# Altium PCB FMU3_REV_G.PcbDoc (part 2 of 4)
Units mm, origin at the board's own origin, x right, y up, seen from the top; angles counter-clockwise.
Board outline 34.01 x 34.03 mm, 8 copper layers (Top, GND_top, HorizontalTop, Verticall_top, Horizontal_bot, VerticalBot, GND_BOT, Bottom), stack 1.63 mm thick; 169 components, 248 nets, 852 pads, 426 vias.
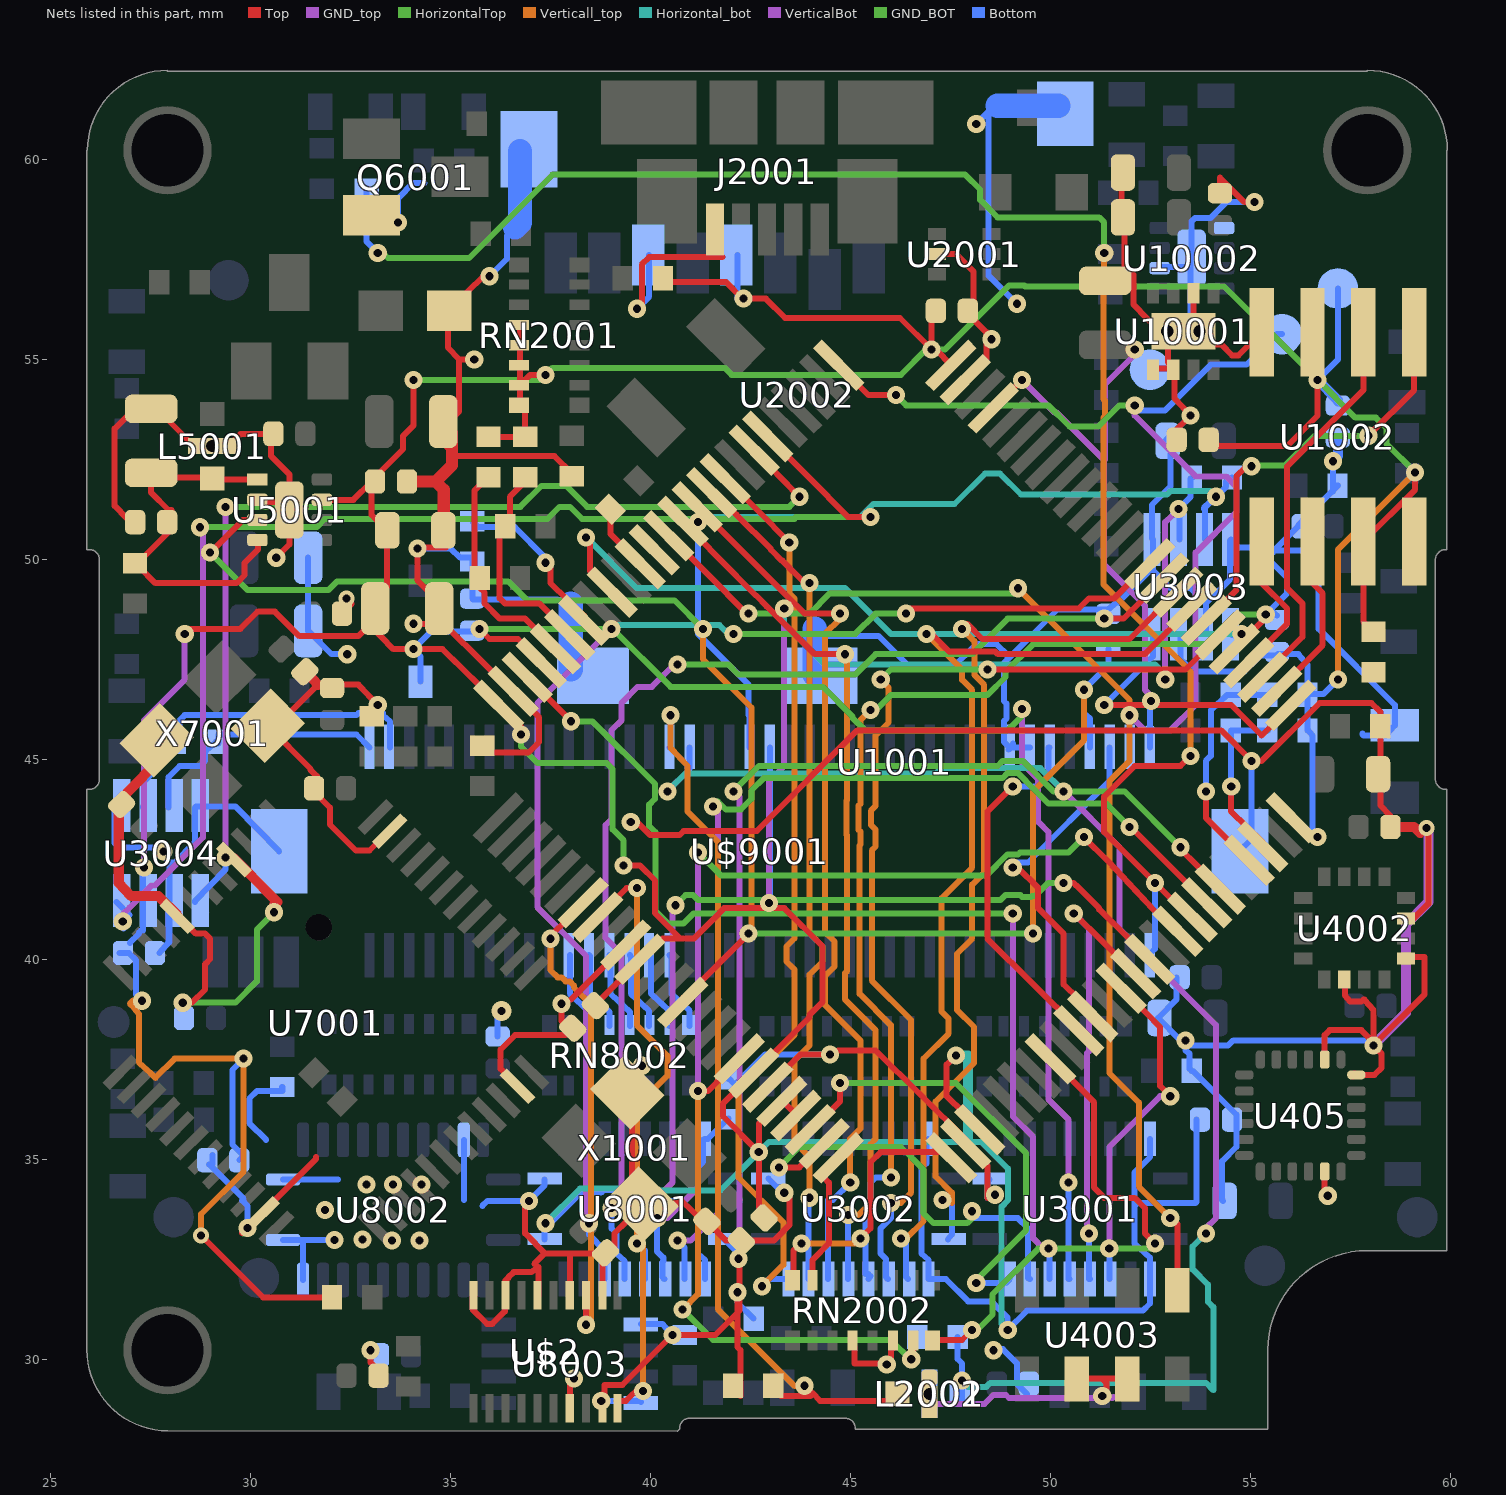
[diagram p8: the nets of this part, all layers, seen from the top]

## Via types
v1: diameter 0.453/0.453/0.453/0.453/0.453/0.453/0.453/0.453 (per signal layer), hole 0.203, Top to Bottom, tented both sides, 178 vias
v2: diameter 0.453/0.453/0.453/0.453 (per signal layer), hole 0.203, Top to Verticall_top, tented both sides, 116 vias
v3: diameter 0.453/0.453/0.453/0.453 (per signal layer), hole 0.203, Horizontal_bot to Bottom, tented both sides, 94 vias
v4: diameter 0.4, hole 0.2, Top to Verticall_top, tented both sides, 8 vias
v5: diameter 0.4, hole 0.2, Horizontal_bot to Bottom, tented both sides, 8 vias
v6: diameter 0.45, hole 0.2, Horizontal_bot to Bottom, tented bottom, 4 vias
v7: diameter 0.5, hole 0.2, Top to Verticall_top, tented both sides, 4 vias
v8: diameter 0.4, hole 0.2, Top to Bottom, tented bottom, 2 vias
v9: diameter 0.453/0.453/0.453/0.453/0.453/0.453/0.453/0.453 (per signal layer), hole 0.203, Top to Bottom, tented top, 2 vias
v10: diameter 0.5, hole 0.2, Horizontal_bot to Bottom, tented both sides, 2 vias
v11: diameter 0.453/0.453/0.453/0.453 (per signal layer), hole 0.203, Horizontal_bot to Bottom, tented bottom, 1 vias
v12: diameter 0.45, hole 0.2, Top to Verticall_top, tented top, 1 vias
v13: diameter 0/0/0/0/0/0 (per signal layer), hole 0.66, HorizontalTop to Bottom, tented bottom, 1 vias
v14: diameter 0.5, hole 0.2, Top to Bottom, tented both sides, 1 vias
v15: diameter 0.4, hole 0.2, Top to Bottom, tented both sides, 1 vias
v16: diameter 0.453/0.453/0.453/0.453/0.453/0.453/0.453/0.453 (per signal layer), hole 0.203, Top to Bottom, tented bottom, 1 vias
v17: diameter 0.453/0.453/0.453/0.453 (per signal layer), hole 0.203, Top to Verticall_top, tented top, 1 vias
v18: diameter 0.5, hole 0.2, HorizontalTop to Bottom, tented both sides, 1 vias

## Nets (pads, with @x,y where several pads share a name; then routed paths per layer and width w, separated by ;. In a path a pad name is that pad's centre, name@x,y a point inside that pad or via, vN(x,y) a via of type N, cw(c..) or ccw(c..) an arc to the next point about the centre after c; other vN are vias at no path point) (continued)
B\A\R\O\_\C\S\: U1001.88 U4003.5 | length 29.4
  Top w0.15: U1001.88@40.462,50.597 42.393,48.641 v2(42.443,48.641) ; v2(52.984,33.528) 53.162,33.376 U4003.5@53.162,31.725
  HorizontalTop w0.15: v2(42.443,48.641) 43.967,48.641 44.475,49.149 49.047,49.149 v2(49.174,49.276)
  Verticall_top w0.15: v2(49.174,49.276) 51.968,46.482 51.968,44.958 51.46,44.45 51.46,37.156 52.197,36.42 52.197,34.315 v2(52.984,33.528)
B\A\R\O\_\E\X\T\_\C\S\: U1001.8 U$2.1 | length 15.7
  Top w0.15: U1001.8@38.684,41.046 39.395,41.783 v2(39.649,41.783) ; U$2.1@39.141,28.956 39.375,28.956 39.776,29.357 39.802,29.332 v2(39.802,29.21) ; U$2.1@39.167,28.778 U$2.1@39.167,28.956
  Verticall_top w0.15: v2(39.649,41.783) 39.649,38.354 40.411,37.592 40.411,37.084 39.649,36.322 39.649,33.02 39.802,32.868 v2(39.802,29.21)
BATT_CURRENT_SENS: RN2002.16 U1001.26 | length 6.7
  Top w0.15: RN2002.16@43.561,31.979 43.561,32.715 43.739,32.893 v2(43.764,32.893) ; v2(45.237,33.02) 45.491,33.274 45.491,34.925 45.745,35.179 47.371,35.179 U1001.26@47.523,35.052
  Verticall_top w0.15: v2(43.764,32.893) 45.11,32.893 v2(45.237,33.02)
BATT_CURRENT_SENS_PROT: L2001.P$1 R2004.P$1 U$9001.49 | length 22.5
  Top w0.15: R2004.P$1@43.256,29.083 43.993,29.083 44.044,29.159 ; v2(43.84,29.337) 44.018,29.159 ; 43.942,29.083 44.018,29.159 ; L2001.P$1@46.025,28.88 45.999,28.88 45.999,28.956 44.231,28.956 44.044,29.159 ; 44.018,29.159 44.044,29.159
  Verticall_top w0.15: v1(40.488,46.101) 40.488,45.288 40.919,44.831 40.919,43.688 41.681,42.926 41.681,31.242 43.586,29.337 v2(43.84,29.337)
  Bottom w0.15: U$9001.49@40.462,45.288 40.488,45.314 v1(40.488,46.101)
BATT_VOLTAGE_SENS: RN2002.15 U1001.25 | length 3.4
  Top w0.15: RN2002.15@44.044,31.979 44.044,32.487 44.45,32.893 44.45,34.417 44.348,34.519 44.348,34.671 44.704,35.027 U1001.25@44.704,35.052
BATT_VOLTAGE_SENS_PROT: L2002.P$1 R2003.P$1 U$9001.47 | length 37.4
  Horizontal_bot w0.15: v3(40.411,44.196) 40.864,44.649 47.134,44.649 47.261,44.776 49.738,44.776 v3(50.317,44.196) ; v3(47.777,29.464) 47.93,29.312 48.385,29.312 48.482,29.408 53.878,29.408 54.061,29.226 54.061,31.303 53.929,31.435 53.929,31.866 53.546,32.249 53.546,32.819 v3(53.873,33.147) 53.752,33.147 v3@53.813,33.086
  VerticalBot w0.15: v3(50.317,44.196) 51.714,42.799 51.714,40.767 54.127,38.354 54.127,33.528 53.873,33.274 v3(53.873,33.147)
  Bottom w0.15: v3(40.411,44.196) 40.97,44.755 U$9001.47@40.97,45.288 ; L2002.P$1@47.625,28.88 47.701,28.956 47.777,28.956 v3(47.777,29.464) ; R2003.P$1@47.668,30.556 47.668,30.005 47.777,29.896 v3(47.777,29.464) ; v3@47.854,29.464 47.854,29.54 v3(47.777,29.464)
CAN1_RX: U1001.81 U3004.4 | length 32.3
  Top w0.15: U1001.81@42.926,53.086 44.933,51.054 v2(45.491,51.054)
  HorizontalTop w0.15: v1(28.727,50.8) 31.648,50.8 31.854,51.006 37.41,51.006 37.71,51.306 37.982,51.306 38.282,51.006 43.585,51.006 43.633,51.054 v2(45.491,51.054)
  VerticalBot w0.15: v3(26.797,40.945) 26.797,41.123 26.966,41.292 27.513,41.838 27.594,41.838 28.799,43.043 28.799,50.728 v1(28.727,50.8)
  Bottom w0.15: U3004.4@26.645,41.427 26.966,41.106 26.805,40.945 v3(26.797,40.945) 26.797,40.792 26.816,40.774 U3004.4@26.695,40.894
CAN1_TX: U1001.82 U3004.1 | length 26.7
  Top w0.15: U1001.82@42.57,52.73 v2(43.713,51.562)
  HorizontalTop w0.15: v1(29.362,51.308) 36.739,51.308 37.265,51.835 37.88,51.835 38.407,51.308 43.459,51.308 v2(43.713,51.562)
  VerticalBot w0.15: v3(29.362,42.545) v1(29.362,51.308)
  Bottom w0.15: U3004.1@28.6,41.427 28.6,41.453 29.362,42.24 v3(29.362,42.545)
CAN2_RX: U1001.51 U3003.4 | length 7.7
  Top w0.15: v1(51.333,46.355) 54.508,46.355 55.27,45.593 56.007,46.33 U1001.51@56.007,46.355
  Bottom w0.15: v1@51.333,46.482 v1(51.333,46.355) 52.553,47.574 U3003.4@52.553,48.133
CAN2_TX: U1001.92 U3003.1 | length 19.3
  Top w0.15: v1(38.379,50.546) 38.481,50.444 38.481,49.708 39.014,49.2 U1001.92@39.04,49.2
  Horizontal_bot w0.15: v1(38.379,50.546) 39.649,49.276 44.856,49.276 45.999,48.133 v3(54.762,48.133)
  Bottom w0.15: U3003.1@54.508,48.133 54.534,48.108 54.737,48.108 v3(54.762,48.133)
CAN_H_1: R3010.P$1 U3004.7 U$9001.79 | length 6.7
  Bottom w0.15: U3004.7@27.94,43.79 27.94,44.552 28.219,44.831 28.727,44.831 28.854,44.958 28.854,45.212 28.88,45.212 29.134,45.441 29.185,45.39 29.185,45.618 32.639,45.618 U$9001.79@32.969,45.288
CAN_H_2: R3009.P$1 U3003.7 U$9001.41 | length 22.3
  Horizontal_bot w0.15: v3(41.173,50.927) 41.3,51.054 45.237,51.054 45.563,51.38 47.59,51.38 48.352,52.142 48.727,52.142 49.252,51.617 52.907,51.617 53,51.71 53.979,51.71 v3(54.127,51.562)
  Bottom w0.15: v3(41.173,50.927) 41.173,48.133 42.443,46.863 42.443,46.101 42.469,46.101 U$9001.41@42.469,45.288 ; U3003.7@53.848,50.495 53.848,51.283 ; v3(54.127,51.562) 53.848,51.283 ; R3009.P$1@54.534,52.045 54.432,51.943 54.381,51.943 54.381,51.816 54.122,51.568 53.823,51.283 53.823,51.257 53.848,51.283
CAN_L_1: R3010.P$2 U3004.6 U$9001.77 | length 8.7
  Bottom w0.15: U3004.6@27.305,43.79 27.305,43.815 27.33,43.866 27.33,44.45 28.143,45.263 28.143,45.466 28.219,45.568 28.219,45.974 28.346,46.101 32.639,46.101 32.69,46.152 33.299,46.152 33.299,46.101 33.477,45.949 U$9001.77@33.477,45.288
CAN_L_2: R3009.P$2 U3003.6 U$9001.39 | length 28.2
  Horizontal_bot w0.15: v3(43.332,48.768) 43.332,48.387 44.348,47.371 52.603,47.371 52.857,47.117 v3(52.857,46.99) v3@52.857,46.863
  VerticalBot w0.15: v3(42.951,41.402) 42.951,44.45 43.332,44.831 v3(43.332,48.768) ; v3(52.857,46.99) 52.857,50.927 53.188,51.232 v3(53.188,51.257)
  Bottom w0.15: v3(42.951,41.402) 42.977,41.427 U$9001.39@42.977,45.288 ; U3003.6@53.213,50.495 53.213,51.232 v3(53.188,51.257) 53.492,51.562 53.492,52.019 R3009.P$2@53.543,52.045
E\X\T\E\R\N\_\C\S\: U1001.36 U$9001.5 | length 8.8
  Top w0.15: v1(49.047,42.291) 49.174,42.291 49.682,41.783 49.682,41.275 50.317,40.64 50.317,39.37 51.054,38.659 U1001.36@51.054,38.583
  Bottom w0.15: v1(49.047,42.291) 49.174,42.418 49.428,42.418 51.46,44.45 U$9001.5@51.46,45.288
EXTERN_DRDY: U1001.35 U$9001.11 | length 9
  Top w0.15: v1(49.047,44.323) 48.412,43.688 48.412,40.513 50.698,38.252 U1001.35@50.698,38.227
  Bottom w0.15: v1(49.047,44.323) 49.682,44.323 49.936,44.577 49.936,45.288 U$9001.11@49.962,45.288
F\M\U\-\L\E\D\_\A\M\B\E\R\: R6013.P$1 U1001.43 U$9001.2 | length 43.9
  Top w0.15: U1001.43@53.302,41.212 v1(52.603,41.91) 51.333,43.18 51.333,44.069 52.095,44.831 53.238,44.831 v2(53.492,45.085)
  HorizontalTop w0.15: v1(33.172,57.658) 33.299,57.658 33.426,57.531 35.458,57.531 37.541,59.614 47.859,59.614 48.23,59.243 48.23,58.983 48.666,58.547 51.206,58.547 51.333,58.42 v2(51.333,57.658)
  Verticall_top w0.15: v2(51.333,57.658) 51.333,57.302 51.312,57.281 51.312,54.001 51.354,53.959 51.354,53.584 51.312,53.542 51.312,49.373 53.492,47.193 v2(53.492,45.085)
  Bottom w0.15: R6013.P$1@32.893,59.284 32.893,57.937 v1(33.172,57.658) ; U$9001.2@52.476,40.107 52.476,40.132 52.603,40.259 v1(52.603,41.91)
F\R\A\M\_\C\S\: U1001.57 U1002.1 | length 10.7
  Top w0.15: U1001.57@53.899,48.489 54.635,49.225 54.635,52.07 54.889,52.324 v2(55.016,52.324) ; v2(57.937,53.086) 59.08,54.229 U1002.1@59.08,55.677
  HorizontalTop w0.15: v2(55.016,52.324) 55.042,52.349 55.855,52.349 56.591,53.086 v2(57.937,53.086)
FMU-!RESET: C5015.P$2 U1001.14 U5001.3 U$9001.7 | length 42
  Top w0.15: v2(28.981,50.165) 29.794,50.978 30.15,50.978 U5001.3@30.175,51.003 ; U1001.14@40.869,38.938 40.818,38.938 U1001.14@40.818,39.014 ; v2(42.443,40.64) U1001.14@40.843,39.04 ; U1001.14@40.818,39.014 U1001.14@40.843,39.04 ; U1001.14@40.818,39.014 40.818,39.04 U1001.14@40.843,39.04
  HorizontalTop w0.15: v2(28.981,50.165) 29.917,49.23 31.938,49.23 32.156,49.448 36.429,49.448 36.906,48.971 40.589,48.971 v2(41.3,48.26) ; v2(42.443,40.64) v2(49.555,40.64)
  Verticall_top w0.15: v2(41.3,48.26) 41.3,47.503 42.515,46.289 42.515,40.712 v2(42.443,40.64) ; v2(49.555,40.64) 49.555,44.196 50.825,45.466 v1(50.825,46.736)
  Bottom w0.15: U$9001.7@50.978,45.288 50.978,46.025 50.825,46.152 v1(50.825,46.736) 51.435,47.346 C5015.P$2@51.435,47.752
FMU-BOOT0: R5006.P$2 U1001.94 | length 4.2
  Top w0.15: v1(37.363,49.911) 37.49,49.784 37.49,49.403 38.329,48.59 U1001.94@38.329,48.489
  Bottom w0.15: R5006.P$2@35.535,50.952 35.687,50.8 36.601,50.8 37.363,50.038 v1(37.363,49.911)
FMU-CH1: U1001.45 U8001.1 | length 26.6
  Top w0.15: v2(53.238,42.799) 53.188,42.799 U1001.45@54.254,41.758
  HorizontalTop w0.15: v1(42.062,44.196) 42.697,44.831 48.664,44.831 48.786,44.953 49.308,44.953 49.678,44.584 49.678,44.582 50.063,44.196 51.841,44.196 v2(53.238,42.799)
  VerticalBot w0.15: v1(42.062,44.196) 42.215,44.069 42.215,32.41 42.189,32.385 v3(42.189,32.512)
  Bottom w0.15: U8001.1@41.834,32.995 42.189,32.639 v3(42.189,32.512)
FMU-CH1-PROT: RN8002.16 U$9001.50 | length 2
  Bottom w0.15: U$9001.50@40.462,40.107 40.513,40.03 40.513,39.141 40.97,38.71 RN8002.16@40.97,38.329
FMU-CH2: U1001.44 U8001.3 | length 26.2
  Top w0.15: v2(51.968,43.307) 51.994,43.307 U1001.44@53.429,41.872
  HorizontalTop w0.15: v1(41.554,43.815) 41.679,43.939 41.875,43.743 42.25,43.743 42.515,44.008 42.515,44.221 42.823,44.529 48.789,44.529 48.912,44.651 49.183,44.651 49.375,44.459 49.375,44.457 49.938,43.894 51.382,43.894 v2(51.968,43.307)
  VerticalBot w0.15: v3(40.665,32.969) 40.996,32.969 41.681,33.655 41.681,43.688 v1(41.554,43.815)
  Bottom w0.15: v3(40.665,32.969) 40.843,32.791 U8001.3@40.843,32.004
FMU-CH2-PROT: RN8002.15 U$9001.52 | length 2
  Bottom w0.15: U$9001.52@39.98,40.107 40.005,40.056 40.005,39.141 40.462,38.71 RN8002.15@40.462,38.329
FMU-CH3: U1001.42 U8001.4 | length 24.8
  Top w0.15: v2(50.825,43.053) 51.416,42.462 52.935,40.846 U1001.42@53.01,40.843
  HorizontalTop w0.15: v1(41.173,42.672) 41.758,42.088 48.381,42.088 48.912,42.619 49.183,42.619 49.23,42.665 50.438,42.665 v2(50.825,43.053)
  VerticalBot w0.15: v3(40.157,33.528) 40.411,33.528 41.173,34.29 v1(41.173,42.672)
  Bottom w0.15: v3(40.157,33.528) 40.157,32.69 40.31,32.537 40.31,32.461 40.284,32.436 40.284,32.055 U8001.4@40.335,32.004
FMU-CH3-PROT: RN8002.14 U$9001.54 | length 2
  Bottom w0.15: U$9001.54@39.472,40.107 39.497,40.056 39.497,39.141 39.954,38.71 RN8002.14@39.954,38.329
FMU-CH4: U1001.40 U8001.5 | length 22.9
  Top w0.15: v2(50.317,41.91) 50.566,41.91 50.638,41.838 50.643,41.838 51.206,41.275 51.206,41.25 U1001.40@52.476,40.005
  HorizontalTop w0.15: v1(40.615,41.351) 40.864,41.601 41.055,41.601 41.173,41.483 48.742,41.483 48.86,41.601 49.235,41.601 49.279,41.557 49.503,41.557 49.526,41.58 49.606,41.58 49.936,41.91 v2(50.317,41.91)
  VerticalBot w0.15: v3(39.649,32.893) 39.649,33.528 39.705,33.583 39.705,33.716 39.97,33.981 40.102,33.981 40.538,34.417 40.538,41.275 v1(40.615,41.351)
  Bottom w0.15: v3(39.649,32.893) 39.853,32.715 U8001.5@39.853,32.004
FMU-CH4-PROT: RN8002.13 U$9001.56 | length 2
  Bottom w0.15: U$9001.56@38.964,40.107 38.989,40.056 38.989,39.141 39.472,38.684 RN8002.13@39.472,38.329
FMU-CH5: U1001.60 U8001.6 | length 30.2
  Top w0.15: v2(51.333,48.514) 51.816,48.514 U1001.60@52.832,49.53
  HorizontalTop w0.15: v1(40.665,47.371) 41.935,47.371 42.189,47.117 45.11,47.117 45.618,47.625 48.031,47.625 48.92,48.514 v2(51.333,48.514)
  VerticalBot w0.15: v3(39.014,33.782) 39.268,34.036 39.268,40.132 38.866,40.534 38.866,43.35 39.014,43.498 39.014,45.72 39.268,45.974 39.268,46.411 39.665,46.808 40.026,46.808 40.665,47.447 v1(40.665,47.371)
  Bottom w0.15: v3(39.014,33.782) 39.014,33.274 39.141,33.147 39.141,32.639 39.345,32.461 U8001.6@39.345,32.004
FMU-CH5-PROT: RN8002.12 U$9001.58 | length 2
  Bottom w0.15: U$9001.58@38.456,40.107 38.481,40.081 38.481,39.141 38.964,38.684 RN8002.12@38.964,38.329
FMU-CH6: U1001.61 U8001.7 | length 32
  Top w0.15: v2(46.38,48.641) 46.507,48.768 50.698,48.768 50.952,49.022 51.587,49.022 52.451,49.886 U1001.61@52.476,49.886
  HorizontalTop w0.15: v1(42.062,48.133) 45.11,48.133 45.618,48.641 v2(46.38,48.641)
  Horizontal_bot w0.15: v3(39.014,48.26) 39.112,48.357 41.711,48.357 41.935,48.133 v1(42.062,48.133)
  VerticalBot w0.15: v3(38.456,33.401) 38.456,33.604 38.379,33.678 38.379,40.081 37.16,41.3 37.16,46.406 v3(39.014,48.26)
  Bottom w0.15: v3(38.456,33.401) 38.456,33.122 38.837,32.715 U8001.7@38.837,32.004
FMU-CH6-PROT: RN8002.11 U$9001.60 | length 2
  Bottom w0.15: U$9001.60@37.973,40.107 37.973,40.081 37.973,39.141 38.456,38.684 RN8002.11@38.456,38.329
FMU-I2C1_SCL: R3002.P$1 R3007.P$1 U1001.95 | length 5.5
  Top w0.15: R3002.P$1@36.855,52.07 36.855,51.943 36.474,51.562 36.474,50.927 36.398,50.825 36.271,50.825 36.22,50.8 36.22,49.022 36.347,48.895 37.211,48.895 U1001.95@37.973,48.133
FMU-I2C1_SDA: R3004.P$1 R3008.P$1 U1001.96 | length 5.8
  Top w0.15: R3008.P$1@35.738,49.403 35.585,49.53 35.585,51.714 R3004.P$1@35.941,52.07 ; R3008.P$1@35.738,49.53 35.738,49.276 35.839,49.174 35.839,48.895 36.22,48.514 36.855,48.514 U1001.96@37.617,47.777
FMU-I2C2_SCL: R3001.P$1 R3005.P$1 U1001.47 | length 5.9
  Top w0.15: v1(53.873,44.196) 53.873,43.536 54.94,42.469 U1001.47@54.94,42.52
  Bottom w0.15: v1(53.873,44.196) 53.873,44.958 54,45.085 54,46.228 54.407,46.609 54.508,46.609 R3001.P$1@55.423,46.609
FMU-I2C2_SDA: R3003.P$1 R3006.P$1 U1001.48 | length 4.1
  Top w0.15: v1(54.508,44.323) 54.508,43.688 55.296,42.926 U1001.48@55.296,42.824
  Bottom w0.15: v1(54.508,44.323) 54.508,45.593 54.508,45.72 R3003.P$1@55.423,45.72
FMU-SWCLK: FMU-SWCLK.P$1 U1001.76 U$9001.3 | length 25.1
  Top w0.15: U1001.76@44.704,54.839 45.441,54.102 v2(46.126,54.102)
  HorizontalTop w0.15: v2(46.126,54.102) 46.38,53.848 49.936,53.848 50.465,53.319 51.185,53.319 51.714,53.848 v1(52.095,53.848)
  VerticalBot w0.15: v3(51.968,46.101) 52.349,45.72 52.984,45.72 53.619,46.355 53.619,50.165 54.635,51.181 54.635,51.816 54.381,52.07 53.619,52.07 52.095,53.594 v1(52.095,53.848)
  Bottom w0.15: U$9001.3@51.968,45.288 v3(51.968,46.101) ; v1(52.095,53.848) 52.222,53.721 52.857,53.721 54,54.864 54.889,54.864 55.651,55.626 FMU-SWCLK.P$1@55.778,55.626
FMU-SWDIO: FMU-SWDIO.P$1 U1001.72 U$9001.1 | length 14.8
  Top w0.15: U1001.72@48.59,53.772 v1(49.276,54.483)
  VerticalBot w0.15: v1(49.276,54.483) 50.086,53.673 50.137,53.673 51.333,52.476 ; v3(52.095,55.245) 52.095,55.118 51.333,54.356 51.354,54.335 51.354,52.497 51.333,52.476 ; v3(52.502,46.457) 52.578,46.457 52.603,46.482 52.349,46.736 52.349,48.844 51.333,49.86 51.333,52.476
  Bottom w0.15: U$9001.1@52.476,45.288 52.476,46.431 v3(52.502,46.457)
FMU-SWO: U1001.89
FMU-UART4_RX: U1001.24 U3001.8 | length 10.8
  Top w0.15: v2(43.205,34.798) 43.713,34.798 44.348,35.433 U1001.24@44.348,35.408
  HorizontalTop w0.15: v2(43.205,34.798) 43.713,35.306 46.253,35.306 46.812,34.747 46.812,33.655 47.066,33.401 47.904,33.401 v1@48.031,33.528
  Bottom w0.15: v1@48.031,33.528 49.174,33.528 49.428,33.274 49.428,32.029 U3001.8@49.479,32.004
  other v1: 48.031,33.7
FMU-UART4_TX: U1001.23 U3001.9 | length 11.5
  Top w0.15: U1001.23@43.993,35.763 44.044,35.763 44.729,36.449 v2(44.729,36.906)
  HorizontalTop w0.15: v2(44.729,36.906) 47.625,36.906 49.38,35.152 49.38,33.225 48.133,31.979 v1(48.133,31.902)
  Bottom w0.15: v1(48.133,31.902) 48.87,31.902 U3001.9@48.971,32.004
FMU-UART7_RX: U1001.38 U3001.4 | length 8.6
  Top w0.15: U1001.38@51.689,39.294 51.765,39.294 52.73,38.303 52.73,36.83 v1(52.984,36.576)
  VerticalBot w0.15: v3(51.46,32.766) 51.46,35.306 52.73,36.576 v1(52.984,36.576)
  Bottom w0.15: U3001.4@51.46,32.004 v3(51.46,32.766)
FMU-UART7_TX: U1001.39 U3001.5 | length 11.5
  Top w0.15: v1(50.571,41.148) 52.095,39.649 U1001.39@52.121,39.649
  VerticalBot w0.15: v1(50.571,41.148) 50.952,40.767 50.952,37.697 50.908,37.652 50.908,33.192 v3(50.952,33.147)
  Bottom w0.15: v3(50.952,33.147) 50.952,32.004 U3001.5@50.978,32.004
FMU-UART8_RX: U1001.97 U3001.6 | length 31.6
  Top w0.15: v2(35.712,48.26) 35.966,48.006 36.678,48.006 U1001.97@37.287,47.422
  HorizontalTop w0.15: v2(35.712,48.26) 39.04,48.26 40.492,46.808 44.302,46.808 45.039,46.071 45.039,46.04 45.359,45.72 48.92,45.72 49.276,46.076 v1(49.276,46.253)
  VerticalBot w0.15: v1(49.276,46.253) 49.276,44.907 49.682,44.501 49.682,43.434 49.936,43.18 49.936,36.5 50.444,35.992 v3(50.444,34.417)
  Bottom w0.15: v3(50.444,34.417) 50.444,32.004 U3001.6@50.47,32.004
FMU-UART8_TX: U1001.98 U3001.7 | length 26.4
  Top w0.15: U1001.98@36.908,47.055 37.998,45.964 v2(37.998,45.949)
  HorizontalTop w0.15: v2(37.998,45.949) 38.537,45.949 40.102,44.384 40.102,44.008 39.959,43.865 39.959,43.332 40.109,43.182 40.109,41.216 40.427,40.898 40.818,40.898 41.067,41.148 v1(49.047,41.148)
  VerticalBot w0.15: v1(49.047,41.148) 49.047,36.068 49.555,35.56 49.555,33.02 49.809,32.766 v3(49.936,32.766)
  Bottom w0.15: v3(49.936,32.766) 49.962,32.766 U3001.7@49.962,32.004
FMU-USART2_CTS: U1001.84 U3002.9 | length 23.1
  Top w0.15: U1001.84@41.859,52.019 41.885,52.019 v2(43.459,50.419)
  Verticall_top w0.15: v1(42.774,31.826) 43.309,32.362 43.309,33.424 42.189,34.544 42.189,36.703 43.586,38.1 43.586,39.746 43.388,39.944 43.388,40.32 43.586,40.518 43.586,49.022 43.459,49.149 v2(43.459,50.419)
  Bottom w0.15: v1(42.774,31.826) 42.954,32.007 U3002.9@43.437,32.007
FMU-USART2_RTS: U1001.85 U3002.8 | length 21.4
  Top w0.15: U1001.85@41.529,51.664 41.605,51.664 42.139,51.116 43.007,50.248 43.007,50.231 43.272,49.966 43.289,49.966 43.852,49.403 v2(43.967,49.403)
  Verticall_top w0.15: v1(43.967,34.036) 43.967,35.052 43.586,35.433 43.586,37.465 43.967,37.846 43.967,39.619 44.293,39.944 44.293,40.32 43.967,40.645 v2(43.967,49.403)
  Bottom w0.15: U3002.8@43.942,32.004 43.942,34.011 v1(43.967,34.036)
FMU-USART2_RX: U1001.87 U3002.6 | length 21.9
  Top w0.15: U1001.87@40.818,50.952 40.818,50.927 41.681,50.038 42.626,49.094 42.631,49.094 42.896,48.829 42.896,48.823 44.094,47.625 v2(44.856,47.625)
  Verticall_top w0.15: v2(44.856,47.625) 44.898,47.583 44.898,43.968 44.892,43.963 44.892,43.109 44.898,43.103 44.898,39.694 44.856,39.652 44.856,38.989 45.618,38.227 45.618,35.509 45.491,35.382 45.491,33.909 45.187,33.604 v1(44.933,33.604)
  Bottom w0.15: U3002.6@44.933,32.004 v1(44.933,33.604)
FMU-USART2_TX: U1001.86 U3002.7 | length 22.4
  Top w0.15: U1001.86@41.173,51.308 41.199,51.308 41.764,50.724 43.846,48.641 v2(44.729,48.641)
  Verticall_top w0.15: v2(44.729,48.641) 44.729,48.514 44.348,48.133 44.348,40.692 44.596,40.445 44.596,39.819 44.348,39.572 44.348,38.862 45.237,37.973 45.237,35.763 44.983,35.509 v1(44.983,34.417)
  Bottom w0.15: U3002.7@44.425,32.004 44.425,33.985 44.552,33.985 v1(44.983,34.417)
FMU-USART3_CTS: U1001.58 U3002.3 | length 25
  Top w0.15: v2(46.888,48.133) 47.015,48.133 47.457,47.691 48.219,47.691 48.225,47.697 48.6,47.697 48.672,47.625 52.349,47.625 53.543,48.819 U1001.58@53.543,48.844
  Verticall_top w0.15: v1(46.253,33.02) 46.38,33.02 46.815,33.454 46.815,37.513 47.443,38.141 47.443,38.516 47.269,38.69 47.269,41.529 48.031,42.291 48.031,46.734 47.782,46.983 47.782,47.239 v2(46.888,48.133)
  Bottom w0.15: v1(46.253,33.02) 46.38,32.893 46.38,32.055 U3002.3@46.431,32.004
FMU-USART3_RTS: U1001.59 U3002.1 | length 22.7
  Top w0.15: v2(47.777,48.26) 47.904,48.387 48.285,48.006 51.968,48.006 53.162,49.2 U1001.59@53.188,49.2
  Verticall_top w0.15: 47.523,33.909 47.523,34.163 47.117,34.569 47.117,36.444 48.078,37.404 48.078,38.309 47.65,38.736 47.65,40.132 48.031,40.513 48.031,41.863 48.334,42.166 48.334,46.859 48.085,47.108 48.085,47.953 v2(47.777,48.26)
  Bottom w0.15: U3002.1@47.422,32.995 47.523,33.122 47.523,33.909
  other v1: 47.295,33.985
FMU-USART3_RX: U1001.56 U3002.4 | length 25.3
  Top w0.15: v2(48.412,47.244) 53.365,47.244 U1001.56@54.254,48.133
  HorizontalTop w0.15: v2(45.745,46.99) 45.999,47.244 v2(48.412,47.244)
  Verticall_top w0.15: v2(45.745,46.99) 45.944,46.791 45.944,45.919 45.618,45.593 45.618,43.834 45.497,43.712 45.497,43.359 45.618,43.238 45.618,42.818 45.522,42.722 45.522,39.466 46.507,38.481 46.507,34.163 46.253,33.909 v1(45.999,33.909)
  Bottom w0.15: U3002.4@45.923,32.004 45.872,32.055 45.872,32.512 45.745,32.639 45.745,33.274 45.999,33.528 v1(45.999,33.909)
FMU-USART3_TX: U1001.55 U3002.5 | length 27.4
  Top w0.15: U1001.55@54.61,47.777 55.372,48.539 v2(55.372,48.616)
  HorizontalTop w0.15: v2(45.491,46.228) 45.624,46.228 46.005,46.609 48.418,46.609 48.865,47.056 48.865,47.189 49.555,47.879 53.873,47.879 54.61,48.616 v2(55.372,48.616)
  Verticall_top w0.15: v2(45.491,46.228) 45.237,45.974 45.237,43.88 45.195,43.837 45.195,43.234 45.237,43.191 45.237,42.864 45.22,42.847 45.22,39.133 45.999,38.354 v1(45.999,34.544)
  Bottom w0.15: U3002.5@45.441,32.004 45.491,32.08 45.441,32.131 45.364,32.131 45.364,33.401 45.491,33.528 45.491,34.417 45.618,34.544 v1(45.999,34.544)
FMU-VDD_3V3: C1001.P$1 C3001.P$1 C3002.P$1 C3003.P$1 C3004.P$1 C5004.P$1 C5005.P$1 C5006.P$1 C5009.P$1 C5010.P$1 C5011.P$1 C5012.P$1 C5014.P$1 C8002.P$1 D5001.A FMU-VDD_3V3.P$1 R1022.P$1 R3001.P$2 R3002.P$2 R3003.P$2 R3004.P$2 R4002.P$2 R7012.P$2 RN2001.12 RN2001.13 RN2001.14 RN2001.15 RN2001.16 U1001.21 U1001.22 U1001.VDD U1002.3 U1002.7 U1002.8 U2002.4 U3001.2 U3001.19 U3002.2 U3002.19 U3003.3 U3004.3 U5001.7 U8001.2 U8001.10 U8001.19 | length 192.3
  Top w0.15: v1(28.346,48.133) 28.473,48.26 29.738,48.26 30.165,48.687 30.6,48.687 31.21,48.078 32.685,48.078 32.969,48.362 33.563,47.752 v1(34.061,47.752) 34.788,47.752 36.22,46.355 36.754,45.822 v2(36.754,45.618) ; U5001.7@31.775,51.486 32.563,51.486 C5005.P$1@33.02,51.943 ; C5006.P$1@33.109,48.768 32.969,48.628 32.969,48.768 32.995,48.819 32.995,48.895 33.401,49.301 33.401,50.698 33.376,50.724 33.02,51.105 C5005.P$1@33.02,51.943 ; v2(34.061,54.483) 34.061,53.34 33.807,53.086 33.807,52.756 33.02,51.968 C5005.P$1@33.02,51.943 ; R3004.P$2@35.941,53.061 R3002.P$2@36.855,53.061 ; RN2001.12@36.728,55.855 RN2001.15@36.728,54.356 ; R3002.P$2@36.855,53.111 R3002.P$2@36.855,53.061 ; v2(37.363,54.61) 36.982,54.61 RN2001.15@36.728,54.356 ; C5012.P$1@38.684,38.913 38.684,38.938 U1001.VDD@39.751,40.005 ; v1(39.319,42.342) 39.731,42.342 40.102,41.971 40.102,41.152 40.742,40.513 ; U1001.VDD@39.751,40.107 U1001.VDD@39.751,40.005 ; R1022.P$1@40.4,56.925 41.881,56.925 42.291,56.515 42.875,56.515 43.358,56.032 46.228,56.032 v1(47.015,55.245) ; C5014.P$1@42.901,33.604 42.697,33.807 v1(42.697,35.179) ; U1001.22@43.637,36.119 43.282,36.449 42.697,35.89 v1(42.697,35.179) ; C5009.P$1@47.041,56.21 47.015,56.21 47.015,55.296 47.066,55.296 v1(47.015,55.245) ; U1001.VDD@47.523,54.839 47.117,55.245 v1(47.015,55.245) ; v1@47.727,37.694 47.396,37.363 47.396,36.576 U1001.VDD@48.235,35.763 ; C5010.P$1@54.051,52.984 54.204,52.832 55.905,52.832 56.667,53.594 v1(56.667,54.483) ; R4002.P$2@58.064,48.184 57.81,48.438 U1002.7@57.81,50.444 59.106,51.74 v2(59.106,52.172) ; RN2001.15@36.728,54.356 36.728,53.873 36.855,53.721 R3002.P$2@36.855,53.061 ; U1001.VDD@39.751,40.005 40.284,40.513 40.742,40.513 ; 40.742,40.513 41.072,40.513 41.834,41.275 43.338,41.275 44.293,40.32 44.293,38.934 43.967,38.608 43.967,38.557 41.808,36.398 41.808,36.068 v1(42.697,35.179)
  Top w0.152: v4(28.753,33.096) 30.302,31.547 R7012.P$2@32.029,31.547
  HorizontalTop w0.15: v2(34.061,54.483) v2@37.236,54.483 ; v2(36.754,45.618) 36.754,45.314 37.165,44.903 38.892,44.903 39.044,44.75 39.044,43.246 39.319,42.971 v1(39.319,42.342) ; v2(37.363,54.61) 37.539,54.785 41.843,54.785 42.018,54.61 46.253,54.61 46.888,55.245 v1(47.015,55.245) 47.354,55.245 48.95,56.841 49.337,56.841 49.358,56.82 54.331,56.82 v1(56.667,54.483) 57.612,53.539 58.125,53.539 58.39,53.274 58.39,52.887 v2(59.106,52.172)
  Verticall_top w0.15: v1(27.28,38.964) 27.051,38.964 26.975,38.887 27.076,38.786 27.203,38.633 27.203,37.414 27.508,37.135 27.61,37.033 28.092,37.516 v1(29.82,37.516) ; v1(57.175,46.99) 57.175,50.241 v2(59.106,52.172)
  Verticall_top w0.152: v4(28.753,33.096) 28.753,33.625 29.82,34.692 v1(29.82,37.516)
  Horizontal_bot w0.15: v3(37.363,33.401) 38.227,34.265 39.798,34.265 39.843,34.219 41.738,34.219 v1(42.697,35.179) 42.951,35.433 47.904,35.433 48.26,35.433 48.929,34.764 48.929,33.976 48.768,33.816 48.768,30.886 v3(48.92,30.734)
  Horizontal_bot w0.254: v1@47.828,37.592 47.93,37.592 47.93,35.433 47.904,35.433
  VerticalBot w0.15: v3(27.33,42.291) 27.33,45.974 28.346,46.99 v1(28.346,48.133)
  Bottom w0.15: C3004.P$1@26.721,40.157 26.949,40.157 27.123,39.984 27.123,39.12 v1(27.28,38.964) ; C3004.P$1@26.975,40.411 27.203,40.64 27.203,40.665 27.254,40.716 27.305,40.716 27.305,42.266 v3(27.33,42.291) ; C8002.P$1@29.712,34.976 29.82,35.084 29.54,35.363 29.54,37.236 v1(29.82,37.516) ; D5001.A@34.239,46.939 34.239,47.574 v1(34.061,47.752) 34.5,48.19 C5011.P$1@35.535,48.19 ; U8001.10@37.338,32.995 37.338,33.376 v3(37.363,33.401) 37.49,33.401 38.252,34.163 38.757,34.163 38.827,34.234 39.201,34.234 39.475,33.96 39.951,33.96 39.97,33.98 40.344,33.98 40.364,33.96 40.843,33.96 41.173,34.29 ; U8001.2@41.351,32.004 41.351,32.487 41.173,32.639 41.173,34.29 ; C3002.P$1@41.935,36.017 41.427,35.509 U8001.19@41.351,35.509 41.3,35.484 41.3,34.925 41.173,34.798 41.173,34.29 ; U2002.4@42.164,57.607 42.164,56.49 42.189,56.515 v1(42.316,56.515) ; U3002.19@46.939,35.509 46.888,35.484 46.888,34.9 46.761,34.773 46.761,32.639 46.939,32.487 U3002.2@46.939,32.007 47.375,32.007 47.932,31.45 48.51,31.45 48.92,31.039 v3(48.92,30.734) 49.403,31.217 52.299,31.217 52.476,31.394 52.476,32.537 52.095,32.893 52.095,33.833 ; U3001.19@52.476,35.509 52.476,35.052 52.095,34.671 52.095,33.833 ; U3003.3@53.213,48.133 53.238,48.082 53.238,47.498 53.569,47.193 54.839,47.193 55.27,47.625 55.296,47.6 55.651,47.6 55.677,47.625 56.185,47.625 56.413,47.371 R3001.P$2@56.413,46.609 ; C3001.P$1@53.645,35.992 53.645,33.934 53.619,33.909 52.172,33.909 52.095,33.833 ; v1(56.667,43.053) 56.667,43.002 56.54,43.129 56.54,45.593 56.413,45.745 R3003.P$2@56.413,45.72 R3001.P$2@56.413,46.609 ; v1(56.667,54.483) 57.175,54.991 FMU-VDD_3V3.P$1@57.175,56.769 ; v1(57.175,46.99) 56.82,46.634 56.439,46.634 R3001.P$2@56.413,46.609
  Bottom w0.254: v1(56.667,54.483) 57.175,53.975 C1001.P$1@57.175,53.95
  other v1: 47.625,37.592
FMU-VDD_5V5: C5001.P$1 C5002.P$1 L5001.P$2 R5001.P$1 U5001.1 U5001.4 | length 9.8
  Top w0.15: U5001.4@30.175,50.495 30.175,50.241 29.845,49.911 29.845,49.606 29.642,49.403 27.61,49.403 27.203,49.809 27.203,49.911 27.102,49.911 27.102,49.886 27.127,49.86 28.016,50.749 28.016,50.927 28.016,51.232 27.94,51.232 27.508,51.664 27.508,52.019 27.534,52.045 29.032,52.045 28.981,51.994 29.845,51.994 U5001.1@30.175,51.994
FMU_AUX_ADC2: RN2002.8 U1001.33 | length 13.2
  Top w0.15: RN2002.8@47.041,30.48 47.777,30.48 v2(48.031,30.734) ; U1001.33@50.013,37.516 51.079,36.424 51.079,34.29 51.333,34.036 52.095,34.036 52.349,33.782 52.349,33.147 v2(52.603,32.893)
  HorizontalTop w0.15: v2(48.031,30.734) 48.031,30.607 48.539,31.115 48.539,31.623 49.682,32.766 52.476,32.766 v2(52.603,32.893)
FMU_AUX_POWER_ADC1: RN2002.7 U1001.18 | length 13.8
  Top w0.15: v2(41.173,36.703) 41.427,36.703 U1001.18@42.215,37.516 ; v17@46.507,29.972 46.482,30.023 46.507,30.074 46.507,30.099 46.558,30.15 RN2002.7@46.558,30.48
  HorizontalTop w0.15: v2(40.792,31.242) 41.554,30.48 45.999,30.48 v17@46.507,29.972
  Verticall_top w0.15: v2(40.792,31.242) 41.173,31.623 v2(41.173,36.703)
  other v17: 46.507,30
FRAM_MISO: U1001.53 U1002.2 | length 10
  Top w0.15: U1001.53@55.296,47.066 56.286,48.057 56.286,48.895 55.905,49.276 55.905,52.324 57.81,54.229 U1002.2@57.81,55.677
FRAM_MOSI: U1001.54 U1002.5 | length 3.7
  Top w0.15: U1001.54@54.94,47.422 55.905,48.387 55.905,48.768 55.27,49.403 U1002.5@55.27,50.444
FRAM_SCK: U1001.52 U1002.6 | length 4.3
  Top w0.15: U1001.52@55.651,46.711 56.794,47.854 56.794,49.149 56.54,49.403 U1002.6@56.54,50.444
"FUTURE USE": R1020.P$2 U1001.90 | length 1.7
  Top w0.15: R1020.P$2@38.985,51.254 38.985,50.634 U1001.90@39.736,49.883
G\Y\R\O\_\E\X\T\_\C\S\: U1001.7 U$2.6 | length 12.2
  Top w0.15: v2(37.49,40.513) 37.49,40.589 U1001.7@38.329,41.402 ; v2(38.379,30.861) 38.354,30.912 38.379,30.937 38.379,31.42 38.379,31.445 U$2.6@38.379,31.598
  Verticall_top w0.15: v2(37.49,40.513) 37.49,39.726 37.668,39.548 37.77,39.548 37.871,39.446 37.973,39.446 38.075,39.345 38.075,39.294 38.506,38.862 38.506,30.988 v2(38.379,30.861)
GND: C1001.P$2 C1002.P$2 C1003.P$1 C3001.P$2 C3002.P$2 C3003.P$2 C3004.P$2 C4001.P$2 C4002.P$2 C4003.P$2 C4005.P$2 C4006.P$2 C4008.2 C5001.P$2 C5002.P$2 C5003.P$1 C5004.P$2 C5005.P$2 C5006.P$2 C5007.P$2 C5008.P$2 C5009.P$2 C5010.P$2 C5011.P$2 C5012.P$2 C5013.P$2 C5014.P$2 C5015.P$1 C5016.P$2 C5100.1 C5101.1 C7001.P$1 C7002.P$2 C7003.P$2 C7004.P$2 C7005.P$1 C7006.P$2 C8001.P$2 C8002.P$2 C8003.P$2 C10001.P$2 C10002.P$2 C10003.P$2 C10004.P$2 C10005.P$2 D8001.A D8002.A J2001.GND L2001.GND L2002.GND L5001.GND Q6001.2 R1002.P$2 R1021.P$1 R2003.P$2 R2004.P$2 R4001.P$1 R4002.P$1 R5003.1 R5006.P$1 R6017.P$2 R7001.P$2 R7002.P$2 R10001.P$1 RN2002.4 RN2002.6 U405.11 U405.18 U405.20 U1001.20 U1001.VSS U1002.4 U2001.2 U2002.6 U3001.11 U3002.11 U3003.2 U3003.5 U3003.8 U3004.2 U3004.5 U3004.8 U4002.6 U4002.9 U4002.11 U4003.2 U4003.3 U5001.2 U5001.GND U7001.4 U7001.8 U7001.23 U7001.35 U7001.47 U8001.11 U8002.11 U8002.12 U8002.13 U8002.22 U8003.1 U8003.4 U10001.2 U10001.5 U10001.6 U10001.GND U10002.2 U10002.5 U10002.GND U$2.3 U$2.4 U$2.7 U$2.8 U$2.12 U$2.16 U$2.20 U$9001.13 U$9001.15 U$9001.GND X1001.2 X1001.4 X7001.2 X7001.4 | length 297.4
  Top w0.15: C5001.P$2@27.026,50.927 26.924,51.029 26.899,51.029 26.594,51.333 26.594,53.264 27.102,53.772 27.381,53.772 27.508,53.924 27.788,53.924 27.915,53.772 27.915,53.492 28.575,52.832 L5001.GND@29.032,52.832 L5001.GND@29.439,52.832 29.743,53.137 C5007.P$2@30.48,53.137 ; X7001.4@27.508,45.339 X7001.4@27.661,45.491 ; U7001.8@28.169,41.097 28.626,40.64 28.854,40.64 28.981,40.513 28.981,40.005 28.854,39.878 28.854,39.243 28.524,38.913 v1(28.296,38.913) ; v1@29.78,33.158 31.623,35.001 31.623,35.052 ; v1@29.903,33.281 v1(29.919,33.281) ; U5001.2@30.175,51.486 30.15,51.46 30.15,51.435 30.632,51.435 30.836,51.232 U5001.GND@30.963,51.232 ; v2(30.632,50.038) 30.963,50.368 U5001.GND@30.963,51.232 ; C5007.P$2@30.658,52.959 C5007.P$2@30.48,53.137 ; C5003.P$1@32.277,48.641 32.512,48.876 32.512,48.895 v15(32.385,49.022) ; v1(32.995,30.226) 32.995,29.921 C7001.P$1@33.299,29.591 ; Q6001.2@33.02,58.623 33.223,58.42 v1(33.68,58.42) ; v2(33.172,46.355) 32.69,46.863 31.674,46.863 30.658,45.847 30.455,45.847 30.429,45.822 31.496,44.755 31.496,44.729 31.648,44.577 31.648,44.12 31.979,43.79 31.979,43.363 32.623,42.718 32.965,42.718 33.452,43.205 U7001.47@33.477,43.205 ; v2(34.061,48.387) 34.493,48.387 C5006.P$2@34.874,48.768 ; C5008.P$2@34.811,53.442 34.811,52.896 35.027,52.68 35.125,52.582 37.588,52.582 38.024,52.146 R1021.P$1@38.024,52.078 ; C5004.P$2@34.823,51.105 34.823,50.775 34.874,50.724 34.874,50.292 34.163,50.292 34.163,49.479 C5006.P$2@34.874,48.768 ; C5008.P$2@35.027,53.162 34.976,53.238 34.976,53.442 35.204,53.696 35.204,54.991 ; U$2.20@35.585,31.598 35.535,31.572 35.535,31.251 35.902,30.884 36.035,30.884 36.347,31.197 U$2.16@36.347,31.521 ; v2(35.585,54.991) 35.204,54.991 ; R6017.P$2@35.738,45.212 35.784,45.166 36.941,45.166 37.207,45.431 37.207,46.049 U1001.VSS@36.554,46.701 ; v1(35.966,57.074) 35.814,57.074 35.027,56.312 35.027,56.21 34.925,56.21 34.925,55.296 35.204,54.991 ; U$2.16@36.347,31.572 U$2.16@36.347,31.521 ; U1001.VSS@36.576,46.711 36.525,46.711 34.95,48.26 34.95,48.692 C5006.P$2@34.874,48.768 ; U7001.35@36.652,36.855 36.246,37.262 36.246,37.744 36.601,38.1 37.871,38.1 37.998,38.227 37.77,38.456 v2(37.77,38.887) ; v1@36.855,33.782 36.855,33.147 37.363,32.639 ; 37.084,32.385 37.338,32.639 37.363,32.639 ; U$2.12@37.186,31.598 37.186,32.309 37.013,32.179 36.568,32.179 36.436,32.047 36.436,32.036 36.347,31.948 36.347,31.623 36.373,31.623 36.373,31.547 U$2.16@36.347,31.521 ; U$2.7@37.973,28.776 U$2.7@37.973,28.778 ; U$2.8@37.973,31.598 37.973,32.639 ; U$2.7@37.998,28.753 U$2.7@37.973,28.778 ; 37.998,38.989 39.37,40.361 U1001.VSS@39.395,40.361 ; v2(38.075,29.515) 37.973,29.413 U$2.7@37.973,28.778 ; U$2.3@38.786,28.776 38.786,29.125 38.839,29.125 38.839,29.358 39.289,29.358 v1(40.538,30.607) 41.605,30.607 42.215,31.217 C5014.P$2@42.215,32.918 ; U$2.4@38.786,31.598 38.786,32.436 38.938,32.588 C1002.P$2@38.938,32.614 ; X1001.2@39.421,36.83 39.421,35.941 39.522,35.814 X1001.4@39.522,34.163 ; X1001.2@39.446,36.678 39.446,37.008 v2(39.776,37.338) ; v1(39.497,43.434) 39.649,43.434 39.98,43.104 40.716,43.104 40.818,43.205 42.647,43.205 45.161,45.72 54.254,45.72 v1(55.016,44.958) 55.27,44.958 56.718,46.406 58.014,46.406 58.234,46.185 R4001.P$1@58.234,45.822 C5013.P$2@58.234,44.682 ; v1@39.7,56.21 v1(39.649,56.261) 39.774,56.386 39.774,57.374 39.954,57.554 41.796,57.554 41.796,57.556 41.631,57.556 41.605,57.582 J2001.GND@41.605,58.471 ; C1003.P$1@41.351,33.401 40.742,33.985 40.691,33.909 39.776,33.909 X1001.4@39.522,34.163 ; C1003.P$1@41.399,33.448 41.881,32.966 C5014.P$2@42.262,32.966 42.262,32.964 43.073,32.964 43.459,33.35 43.459,34.036 v1(43.332,34.163) ; v1(42.164,31.674) 42.164,30.302 42.24,30.226 R2004.P$2@42.24,29.083 ; U1001.20@42.926,36.805 43.739,37.617 v1(44.475,37.617) ; 44.679,37.719 45.618,37.719 47.879,35.484 47.879,35.408 48.412,34.849 v1@48.412,34.036 ; RN2002.4@45.06,30.48 45.06,30.353 45.085,30.302 45.085,29.896 v1@45.872,29.896 ; v1@45.999,29.896 45.999,30.226 46.05,30.277 RN2002.6@46.05,30.48 ; L2001.GND@46.812,28.886 L2001.GND@46.812,29.286 ; U2001.2@47.168,57.633 47.625,57.633 48.059,57.198 48.059,56.346 C5009.P$2@47.923,56.21 ; C5009.P$2@47.777,56.286 48.387,55.677 48.387,54.991 47.879,54.483 U1001.VSS@47.904,54.483 ; U4003.2@50.673,29.515 51.283,29.515 ; v2@51.384,29.083 51.384,29.413 51.283,29.515 ; C10005.P$2@51.765,59.665 51.765,58.547 51.841,58.471 C10004.P$2@51.841,58.293 ; U4003.3@51.841,29.489 51.892,29.489 51.918,29.515 51.283,29.515 ; C10004.P$2@51.968,58.42 C10004.P$2@51.841,58.293 ; U10001.5@52.578,54.762 U10001.6@53.086,54.762 ; C5010.P$2@52.984,53.086 v1(53.492,53.594) ; C5010.P$2@53.061,52.984 53.061,53.162 v1(53.492,53.594) ; U10001.2@53.569,56.667 53.569,55.855 U10001.GND@53.721,55.702 ; C10003.P$2@54.229,59.258 54.229,59.538 54.839,58.928 v1(55.093,58.928) ; U1002.4@55.27,55.677 54.686,55.093 54.534,55.093 54.254,55.372 54.026,55.372 53.721,55.677 U10001.GND@53.721,55.702 ; U4002.6@57.353,39.497 57.353,39.091 57.48,38.938 57.76,38.938 57.81,38.989 57.836,38.989 58.064,38.735 v1@58.064,37.922 ; v1(58.064,37.846) 59.334,39.116 59.334,40.056 58.903,40.056 U4002.9@58.877,40.03 ; C5013.P$2@58.242,44.628 58.242,43.84 58.75,43.307 ; U4002.11@58.877,41.021 59.07,41.021 59.436,41.387 59.436,43.205 v4@59.36,43.282 ; C5007.P$2@30.48,53.137 30.505,53.111 30.505,52.578 30.963,52.121 U5001.GND@30.963,51.232 ; 37.363,32.639 37.973,32.639 ; 37.973,32.639 38.887,32.639 C1002.P$2@38.938,32.614 ; C1002.P$2@38.938,32.614 39.091,32.766 39.091,33.147 39.395,33.452 39.395,34.036 X1001.4@39.522,34.163 ; C10004.P$2@51.841,58.293 51.841,57.277 52.019,57.125 52.07,57.125 52.07,56.363 52.705,55.702 U10001.GND@52.934,55.702 ; U10001.GND@52.934,55.702 52.934,54.915 U10001.6@53.086,54.762 ; U10001.GND@52.934,55.702 U10001.GND@53.315,55.702 U10001.GND@53.721,55.702 ; U10001.6@53.086,54.762 53.086,54.026 v1(53.492,53.594)
  Top w0.152: v1@56.845,34.061 U405.11@56.845,34.693 ; U405.20@56.845,37.493 56.845,38.1 56.972,38.227 57.76,38.227 58.064,37.922 v1(58.064,37.846) 58.268,37.643 58.268,37.287 58.09,37.109 U405.18@57.636,37.109 ; U405.18@57.558,37.075 57.558,37.109 U405.18@57.592,37.144
  Top w0.254: X7001.4@27.508,45.339 27.508,44.78 26.695,43.942 26.695,41.91 27,41.58 27.686,41.58 U7001.8@28.169,41.097 ; U7001.4@29.591,42.52 30.505,41.58 30.658,41.427 30.582,41.351 v1(30.582,41.173) ; C7004.P$2@31.42,47.142 31.674,46.863 ; 58.75,43.307 59.08,43.307 59.233,43.155 v4@59.36,43.282
  Top w0.305: C5005.P$2@34.011,51.943 34.62,51.943 ; C5004.P$2@34.849,51.105 34.823,51.105 34.823,51.74 34.62,51.943 ; C5008.P$2@35.027,53.162 35.027,52.68 35.027,52.349 34.62,51.943
  GND_top w0.15: 46.812,28.88 48.336,28.88 48.562,29.106 48.878,29.106 48.952,29.032 51.537,29.032 51.562,29.058
  GND_top w0.254: v1(58.064,37.846) 58.877,38.659 58.877,40.869 59.436,41.427 59.436,43.332 v4(59.385,43.282)
  HorizontalTop w0.15: v1@29.803,33.143 29.919,33.258 v1(29.919,33.281) ; v1(32.995,30.226) v1@32.995,30.282 ; v1@45.898,29.867 v1(45.898,29.87)
  GND_BOT w0.15: v1(28.296,38.913) 29.616,38.913 30.15,39.446 30.15,40.742 v1(30.582,41.173)
  Bottom w0.15: U3004.5@26.645,43.79 26.594,43.739 26.594,42.901 26.695,42.799 27.584,42.799 ; v1@27.762,42.647 27.965,42.418 ; U3004.2@27.94,41.427 27.94,40.411 27.711,40.157 27.965,40.437 27.965,42.418 ; C8002.P$2@28.956,34.874 29.82,34.011 29.78,33.971 29.919,33.831 v1(29.919,33.281) ; C8002.P$2@29.039,34.874 C8002.P$2@29.039,35.109 ; U$9001.GND@30.709,42.697 29.616,43.815 28.626,43.815 28.6,43.79 28.6,42.926 28.092,42.418 27.965,42.418 ; U8002.12@30.803,32.981 v3(32.092,32.981) ; U8002.13@30.803,34.493 32.182,34.493 ; U8002.11@31.303,31.981 31.303,32.945 ; C5101.1@31.432,50.038 C5100.1@31.432,48.209 32.017,47.625 v1(32.41,47.625) ; v1(33.68,58.42) 33.68,59.03 34.061,59.411 34.341,59.411 ; v1(34.163,50.267) 35.001,50.267 35.23,50.038 R5006.P$1@35.538,50.038 ; 35.323,33.977 U8002.22@35.323,35.484 ; R5006.P$1@35.535,49.944 C5011.P$2@35.535,49.016 35.554,48.997 37.668,48.997 37.871,48.793 37.871,47.371 U2002.6@37.998,47.244 ; 35.789,33.833 35.916,33.96 v1(36.957,33.96) 37.338,34.341 U8001.11@37.338,34.493 ; v1(35.966,57.074) 36.398,57.506 36.398,58.09 36.601,58.293 ; v3(38.76,28.956) 39.726,28.956 U8003.4@39.751,28.931 ; v1(39.649,56.261) 39.954,56.566 U2002.6@39.954,57.607 ; U8003.1@39.751,30.886 40.284,30.886 v1(40.538,30.607) ; C3002.P$2@41.935,37.008 41.935,37.033 42.1,36.868 42.85,37.617 v1(44.475,37.617) ; v1(42.164,31.674) 42.164,31.42 D8001.A@42.57,31.013 ; U3002.11@42.937,34.519 43.292,34.163 v1(43.332,34.163) ; 44.094,48.184 44.196,48.082 45.695,48.082 46.507,47.269 47.523,47.269 48.133,47.879 48.641,47.879 48.92,47.6 48.92,47.498 ; L2001.GND@46.812,29.286 46.812,28.886 L2002.GND@46.965,28.734 ; v1(48.133,60.884) 48.438,61.189 ; v1@48.412,34.036 48.412,34.468 U3001.11@48.463,34.493 ; v3@48.59,30.251 48.799,30.251 49.149,29.901 49.149,29.388 C4006.P$2@49.4,29.137 ; U$9001.15@48.946,45.237 U$9001.15@48.997,45.288 ; U$9001.15@49.047,45.39 U$9001.15@48.971,45.288 ; v1(49.149,56.388) 48.438,57.099 48.438,61.189 ; U$9001.13@49.479,45.288 U$9001.15@48.971,45.288 ; U2002.6@50.19,61.341 50.14,61.29 48.539,61.29 48.438,61.189 ; U10002.2@52.73,57.302 53.492,57.302 U10002.GND@53.492,57.277 ; C5016.P$2@52.883,52.959 52.883,52.984 v1(53.492,53.594) 52.984,53.086 C5016.P$2@52.984,53.061 ; C5016.P$2@53.061,53.111 C5016.P$2@52.984,53.061 ; C4003.P$2@53.137,39.548 53.137,38.989 52.68,38.532 53.238,37.973 v1(53.365,37.973) 53.365,37.719 53.467,37.643 53.467,37.262 R1002.P$2@53.518,37.211 53.543,37.211 54.635,36.119 54.635,35.306 54.28,34.95 54.28,33.985 C4001.P$2@54.305,33.96 ; v1@53.365,37.846 54.432,37.846 54.559,37.973 58.064,37.973 v1(58.064,37.846) ; U10001.GND@53.721,55.702 53.492,55.931 U10002.GND@53.492,57.277 ; U3003.2@53.848,48.133 53.873,48.158 53.873,48.895 ; U$9001.GND@54.712,42.697 55.016,43.002 v1(55.016,44.958) ; v1(55.093,58.928) 54.387,58.928 53.985,58.526 53.598,58.526 53.518,58.445 U10002.GND@53.518,57.531 53.492,57.506 U10002.GND@53.492,57.277 ; C3003.P$2@55.372,48.616 55.499,48.743 ; C3003.P$2@55.651,48.59 55.499,48.743 ; R10001.P$1@57.048,51.689 R10001.P$1@57.048,51.841 ; v1(57.048,52.451) R10001.P$1@57.048,51.841 ; 57.785,45.644 57.785,45.618 57.81,45.593 58.369,45.593 C4008.2@58.598,45.847 58.598,46.355 56.693,48.26 56.693,49.987 56.464,50.216 55.651,50.216 55.626,50.267 ; 48.92,47.498 50.165,48.743 51.435,48.743 51.638,48.92 51.689,48.92 52.527,49.759 ; 48.92,47.498 48.823,47.401 48.823,46.458 48.891,46.39 48.891,46.015 48.826,45.95 48.826,45.433 U$9001.15@48.971,45.288 ; 52.527,49.759 52.553,49.784 52.553,50.495 52.527,50.521 52.527,51.359 52.984,51.816 C5016.P$2@52.984,53.061 ; 52.527,49.759 52.984,49.276 53.492,49.276 53.873,48.895 ; 53.873,48.895 54.483,49.505 54.483,50.47 54.508,50.495 54.635,50.343 54.635,50.292 55.143,50.292 55.27,50.165 ; 55.27,50.165 55.55,50.165 55.55,50.19 55.626,50.267 ; 55.27,50.165 55.905,49.53 55.905,49.149 55.499,48.743 ; 55.626,50.267 56.185,50.825 56.185,50.851 57.175,51.841 R10001.P$1@57.048,51.841
  Bottom w0.152: 30.378,35.487 29.965,35.901 29.965,36.518 30.157,36.71 30.785,36.71 R7002.P$2@30.785,36.805 ; C8003.P$2@36.17,38.068 36.17,38.608 v10(36.271,38.71)
  Bottom w0.254: v1(57.048,52.451) 57.175,52.578 C1001.P$2@57.175,52.959
  Bottom w0.61: 36.601,58.293 36.728,58.42 U2002.6@36.728,60.198 ; U2002.6@37.998,47.244 37.998,48.895 ; U2002.6@44.094,47.117 44.094,48.184 44.094,48.26 ; 48.666,61.341 U2002.6@50.19,61.341
  other v1: 56.921,34.087 48.601,34.112 27.813,42.697 48.514,55.499
  other v2: 51.283,29.083
  other v3: 48.565,30.226 33.528,32.969 34.214,32.969 32.791,32.995 31.852,33.731 32.893,34.366 33.553,34.366 34.265,34.366